# EAGLE board arduino shield (1) (EAGLE 7.4.0)
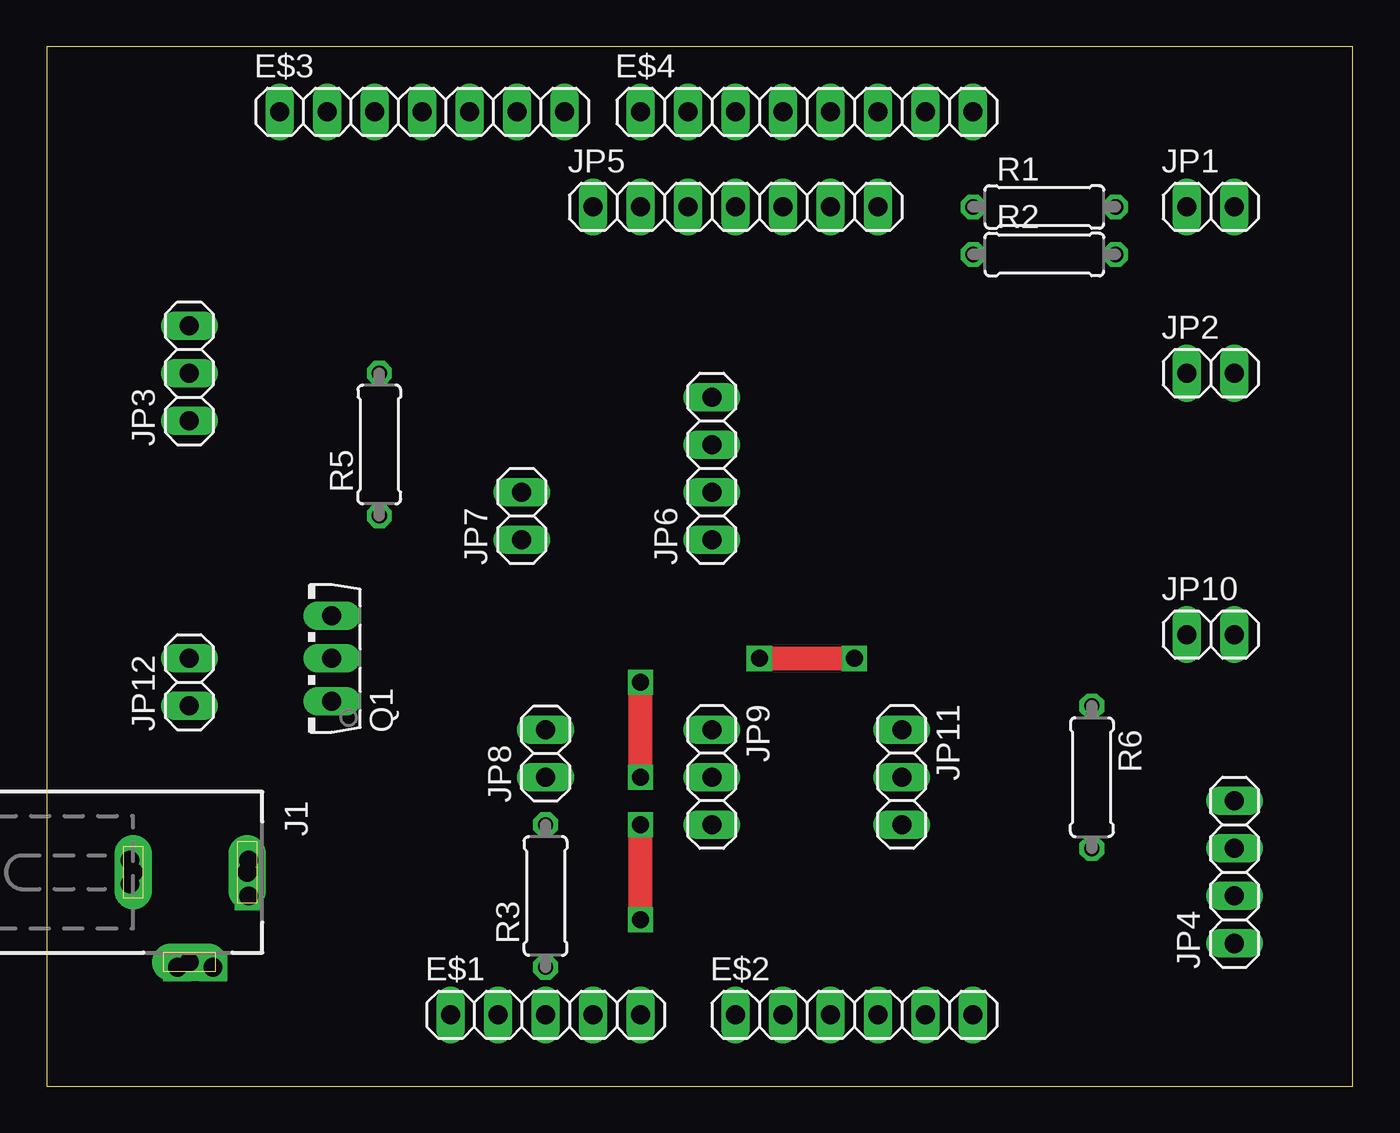
[diagram p0: board, top side]
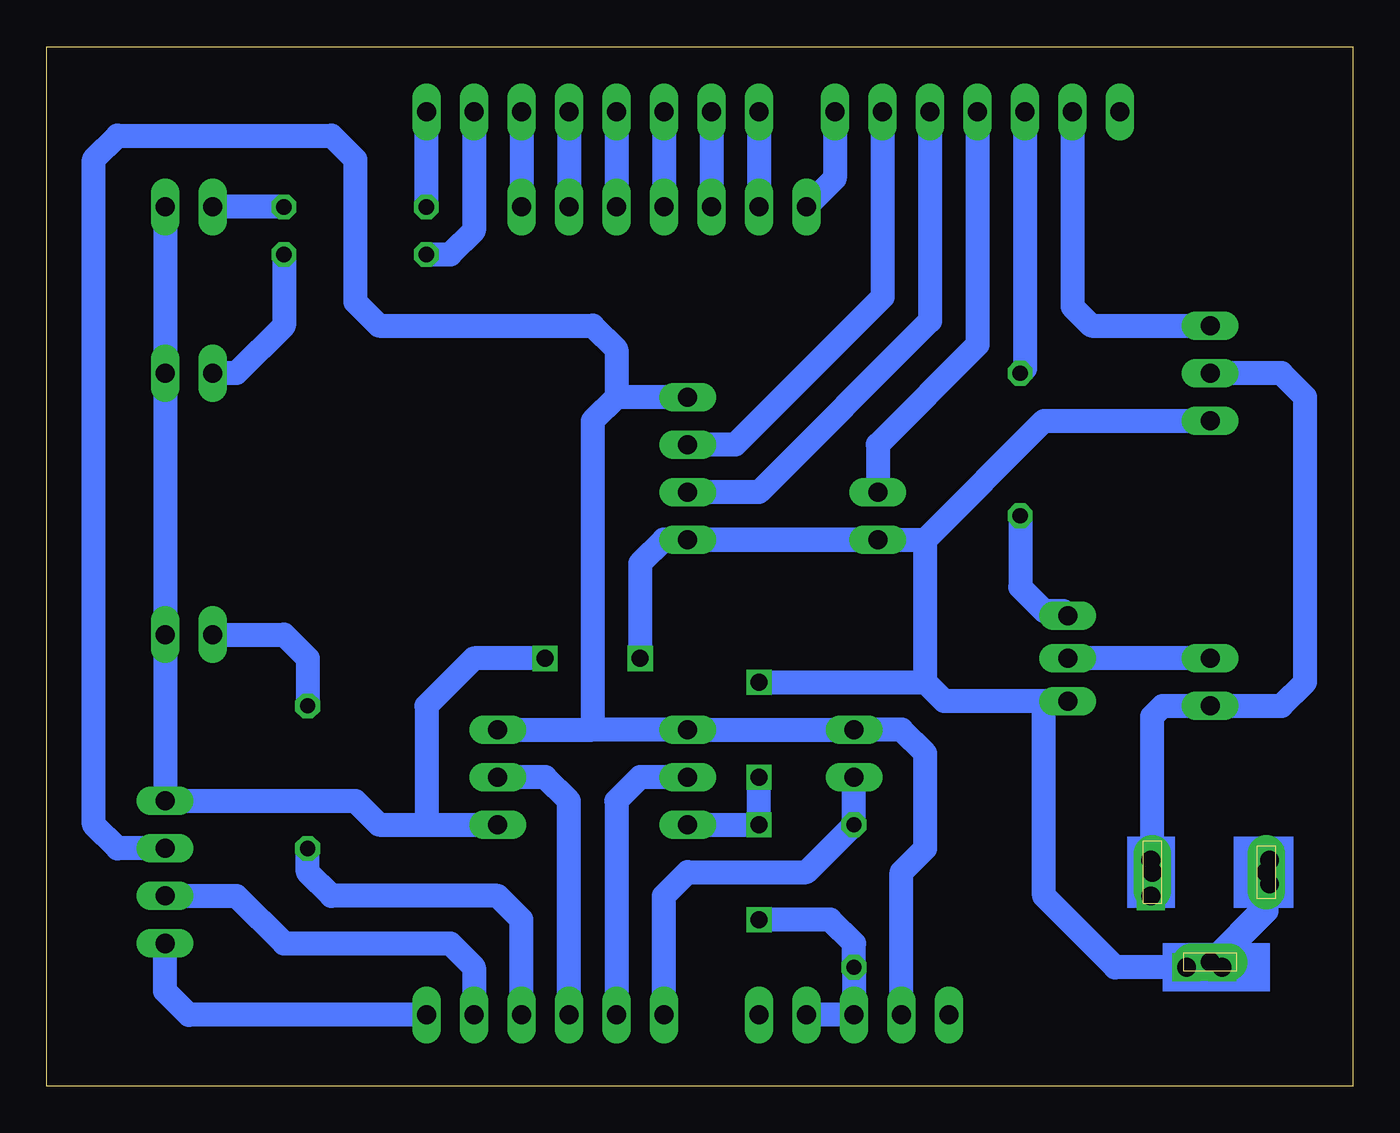
[diagram p1: board, bottom side, seen from below]

Size 69.83 x 55.55 mm. Coordinates in mm from the lower left corner, seen from the top.
Outline: 0,0 69.83,0 69.83,55.55 0,55.55 0,0
Copper layers (1*16): Top 0.035mm / dielectric 1.5mm / Bottom 0.035mm
Design rules "default": minimum track width 10mil, minimum drill 24mil, track to track 8mil, track to pad 8mil, pad to pad 8mil, via to via 8mil, smd to smd 8mil, copper to edge 40mil, drill to drill 8mil, minimum pad ring 10mil, minimum via ring 8mil, stop-mask expansion 4mil, vias tented up to drill 0mil, thermal gap 10mil

## Footprints (pad centres in the part's own frame; a part is rotated, then mirrored left to right if it is on the bottom)
1X05 = drill 1.016 long: 1 -5.08,0; 2 -2.54,0; 3 0,0; 4 2.54,0; 5 5.08,0
1X06 = drill 1.016 long: 1 -6.35,0; 2 -3.81,0; 3 -1.27,0; 4 1.27,0; 5 3.81,0; 6 6.35,0
1X07 = drill 1.016 long: 1 -7.62,0; 2 -5.08,0; 3 -2.54,0; 4 0,0; 5 2.54,0; 6 5.08,0; 7 7.62,0
1X08 = drill 1.016 long: 1 -8.89,0; 2 -6.35,0; 3 -3.81,0; 4 -1.27,0; 5 1.27,0; 6 3.81,0; 7 6.35,0; 8 8.89,0
DCJ0202 = drill 1 pad 2 long: 1 0,3.1; 2 4.8,0; 3 0,-3
1X02 = drill 1.016 long: 1 -1.27,0; 2 1.27,0
1X03 = drill 1.016 long: 1 -2.54,0; 2 0,0; 3 2.54,0
1X04 = drill 1.016 long: 1 -3.81,0; 2 -1.27,0; 3 1.27,0; 4 3.81,0
TO126AV = drill 1.016 long: B 2.286,-1.27; C 0,-1.27; E -2.286,-1.27
0207/7 = drill 0.813 octagon: 1 -3.81,0; 2 3.81,0

## Placement (x,y rotation side)
E$1  [1X05]  26.67,3.81 0 top
E$2  [1X06]  43.18,3.81 0 top
E$3  [1X07]  20.07,52.07 0 top
E$4  [1X08]  40.64,52.07 0 top
J1  DCJ0202  [DCJ0202]  7.62,11.43 270 top
JP1  [1X02]  62.23,46.99 0 top
JP2  [1X02]  62.23,38.1 0 top
JP3  [1X03]  7.62,38.1 90 top
JP4  [1X04]  63.5,11.43 90 top
JP5  [1X07]  36.83,46.99 0 top
JP6  [1X04]  35.56,33.02 90 top
JP7  [1X02]  25.4,30.48 90 top
JP8  [1X02]  26.67,17.78 90 top
JP9  [1X03]  35.56,16.51 270 top
JP10  [1X02]  62.23,24.13 0 top
JP11  [1X03]  45.72,16.51 270 top
JP12  [1X02]  7.62,21.59 90 top
Q1  BD139  [TO126AV]  13.97,22.86 90 top
R1  [0207/7]  53.34,46.99 0 top
R2  [0207/7]  53.34,44.45 0 top
R3  [0207/7]  26.67,10.16 90 top
R5  [0207/7]  17.78,34.29 90 top
R6  [0207/7]  55.88,16.51 270 top

## Library data of the parts
E$1-E$4 JP1-JP12 = pinhead
J1 = con-jack; OC_FARNELL: unknown; OC_NEWARK: unknown
Q1 = transistor-power
R1-R3 R5 R6 = rcl

## Nets
+5V: JP4.3 JP6.4 JP8.2 JP9.1 JP11.1
GND: J1.2 J1.3 JP1.2 JP2.2 JP3.1 JP4.4 JP6.1 JP7.1 JP9.3 JP10.2 JP11.3 Q1.E R3.1
N$1: R1.1
N$2: R2.1
N$3: JP5.7
N$4: JP5.6
N$5: JP5.5
N$6: JP5.4
N$7: JP5.3
N$8: JP5.2
N$9: JP5.1
N$10: JP1.1 R1.2
N$11: JP2.1 R2.2
N$12: JP10.1 R6.1
N$13: JP6.3
N$14: JP6.2
N$15: JP7.2
N$16: JP3.3
N$17: J1.1 JP3.2 JP12.1
N$19: JP8.1 R3.2
N$20: JP4.1
N$21: JP4.2
N$22: JP9.2
N$23: R6.2
N$25: JP11.2
N$26: Q1.B R5.1
N$27: JP12.2 Q1.C
N$28: R5.2

## Tracks (layer width: path | path; a pad name or v marks a point on that pad's centre or on a via)
+5V
  Bottom 1.27: JP6.4 39.37,36.83 | 39.37,36.83 40.64,35.56 40.64,19.05 | JP4.3 66.04,12.7 67.31,13.97 67.31,49.53 66.04,50.8 54.61,50.8 53.34,49.53 53.34,41.91 52.07,40.64 40.64,40.64 39.37,39.37 39.37,36.83 | 40.64,19.05 JP9.1 JP8.2 24.13,19.05 22.86,17.78 22.86,12.7 24.13,11.43 24.13,3.81 | JP11.1 40.64,19.05
GND  (via drill 0.9, 1)
  Top 1.27: v38.1,22.86 v43.18,22.86 | v31.75,16.51 v31.75,21.59 | v31.75,8.89 v31.75,13.97
  Bottom 1.27: JP1.2 JP2.2 JP10.2 JP4.4 53.34,15.24 52.07,13.97 49.53,13.97 | 49.53,13.97 JP11.3 | 29.21,3.81 26.67,3.81 R3.1 26.67,7.62 27.94,8.89 v31.75,8.89 | JP6.1 JP7.1 | JP7.1 22.86,29.21 | 22.86,29.21 16.51,35.56 JP3.1 | Q1.E 16.51,20.57 | 16.51,20.57 21.84,20.57 22.86,21.59 | 22.86,21.59 22.86,29.21 | JP7.1 36.83,29.21 38.1,27.94 v38.1,22.86 | v43.18,22.86 46.99,22.86 49.53,20.32 49.53,13.97 | JP9.3 v31.75,13.97 v31.75,16.51 | v31.75,21.59 22.86,21.59 | J1.2 4.62,9.63 J1.3 4.62,9.35 7.62,6.35 v8.89,6.35 12.7,6.35 16.51,10.16 16.51,20.57
N$1
  Bottom 1.27: R1.1 49.53,52.07
N$2
  Bottom 1.27: 46.99,52.07 46.99,45.72 48.26,44.45 R2.1
N$3
  Bottom 1.27: 44.45,52.07 JP5.7
N$4
  Bottom 1.27: 41.91,52.07 JP5.6
N$5
  Bottom 1.27: 39.37,52.07 JP5.5
N$6
  Bottom 1.27: 36.83,52.07 JP5.4
N$7
  Bottom 1.27: 34.29,52.07 JP5.3
N$8
  Bottom 1.27: 31.75,52.07 JP5.2
N$9
  Bottom 1.27: 27.69,52.07 27.69,48.51 JP5.1
N$10
  Bottom 1.27: R1.2 JP1.1
N$11
  Bottom 1.27: R2.2 57.15,40.64 59.69,38.1 JP2.1
N$12
  Bottom 1.27: JP10.1 57.15,24.13 55.88,22.86 R6.1
N$13
  Bottom 1.27: 25.15,52.07 25.15,42.16 33.02,34.29 JP6.3
N$14
  Bottom 1.27: 22.61,52.07 22.61,40.89 31.75,31.75 JP6.2
N$15
  Bottom 1.27: 20.07,52.07 20.07,39.62 25.4,34.29 JP7.2
N$16
  Bottom 1.27: 14.99,52.07 14.99,41.66 13.97,40.64 JP3.3
N$17
  Bottom 1.27: J1.1 10.72,19.76 10.16,20.32 JP12.1 3.81,20.32 2.54,21.59 2.54,36.83 3.81,38.1 JP3.2
N$19
  Bottom 1.27: 36.83,3.81 36.83,10.16 35.56,11.43 29.21,11.43 R3.2 JP8.1
N$20
  Bottom 1.27: 49.53,3.81 62.23,3.81 63.5,5.08 JP4.1
N$21
  Bottom 1.27: JP4.2 59.69,10.16 57.15,7.62 48.26,7.62 46.99,6.35 46.99,3.81
N$22
  Bottom 1.27: JP9.2 38.1,16.51 39.37,15.24 39.37,3.81
N$23
  Bottom 1.27: 44.45,3.81 44.45,8.89 45.72,10.16 54.61,10.16 55.88,11.43 R6.2
N$25
  Bottom 1.27: 41.91,3.81 41.91,15.24 43.18,16.51 JP11.2
N$26
  Bottom 1.27: R5.1 17.78,26.67 16.51,25.4 15.49,25.4 Q1.B
N$27
  Bottom 1.27: JP12.2 Q1.C
N$28
  Bottom 1.27: 17.53,52.07 17.53,38.35 R5.2
S$1  (via drill 1)
  other vias: 4.44,12.07
S$2  (via drill 1)
  other vias: 4.44,10.79
S$3  (via drill 1)
  other vias: 10.79,10.16
S$4  (via drill 1)
  other vias: 10.79,12.07
S$5  (via drill 1)
  other vias: 6.98,6.35
(copper drawn outside any net)
  shapes: Bottom area x3